# Altium PCB IoT_Speaker-PCB-v2.1.PcbDoc (part 2 of 3)
Units mm, origin at the board's own origin, x right, y up, seen from the top; angles counter-clockwise.
Board outline 61.96 x 67.79 mm, 2 copper layers (Top Layer, Bottom Layer), stack 1.57 mm thick; 110 components, 59 nets, 362 pads, 125 vias.
Unrouted connection lines stored in the file: 99.
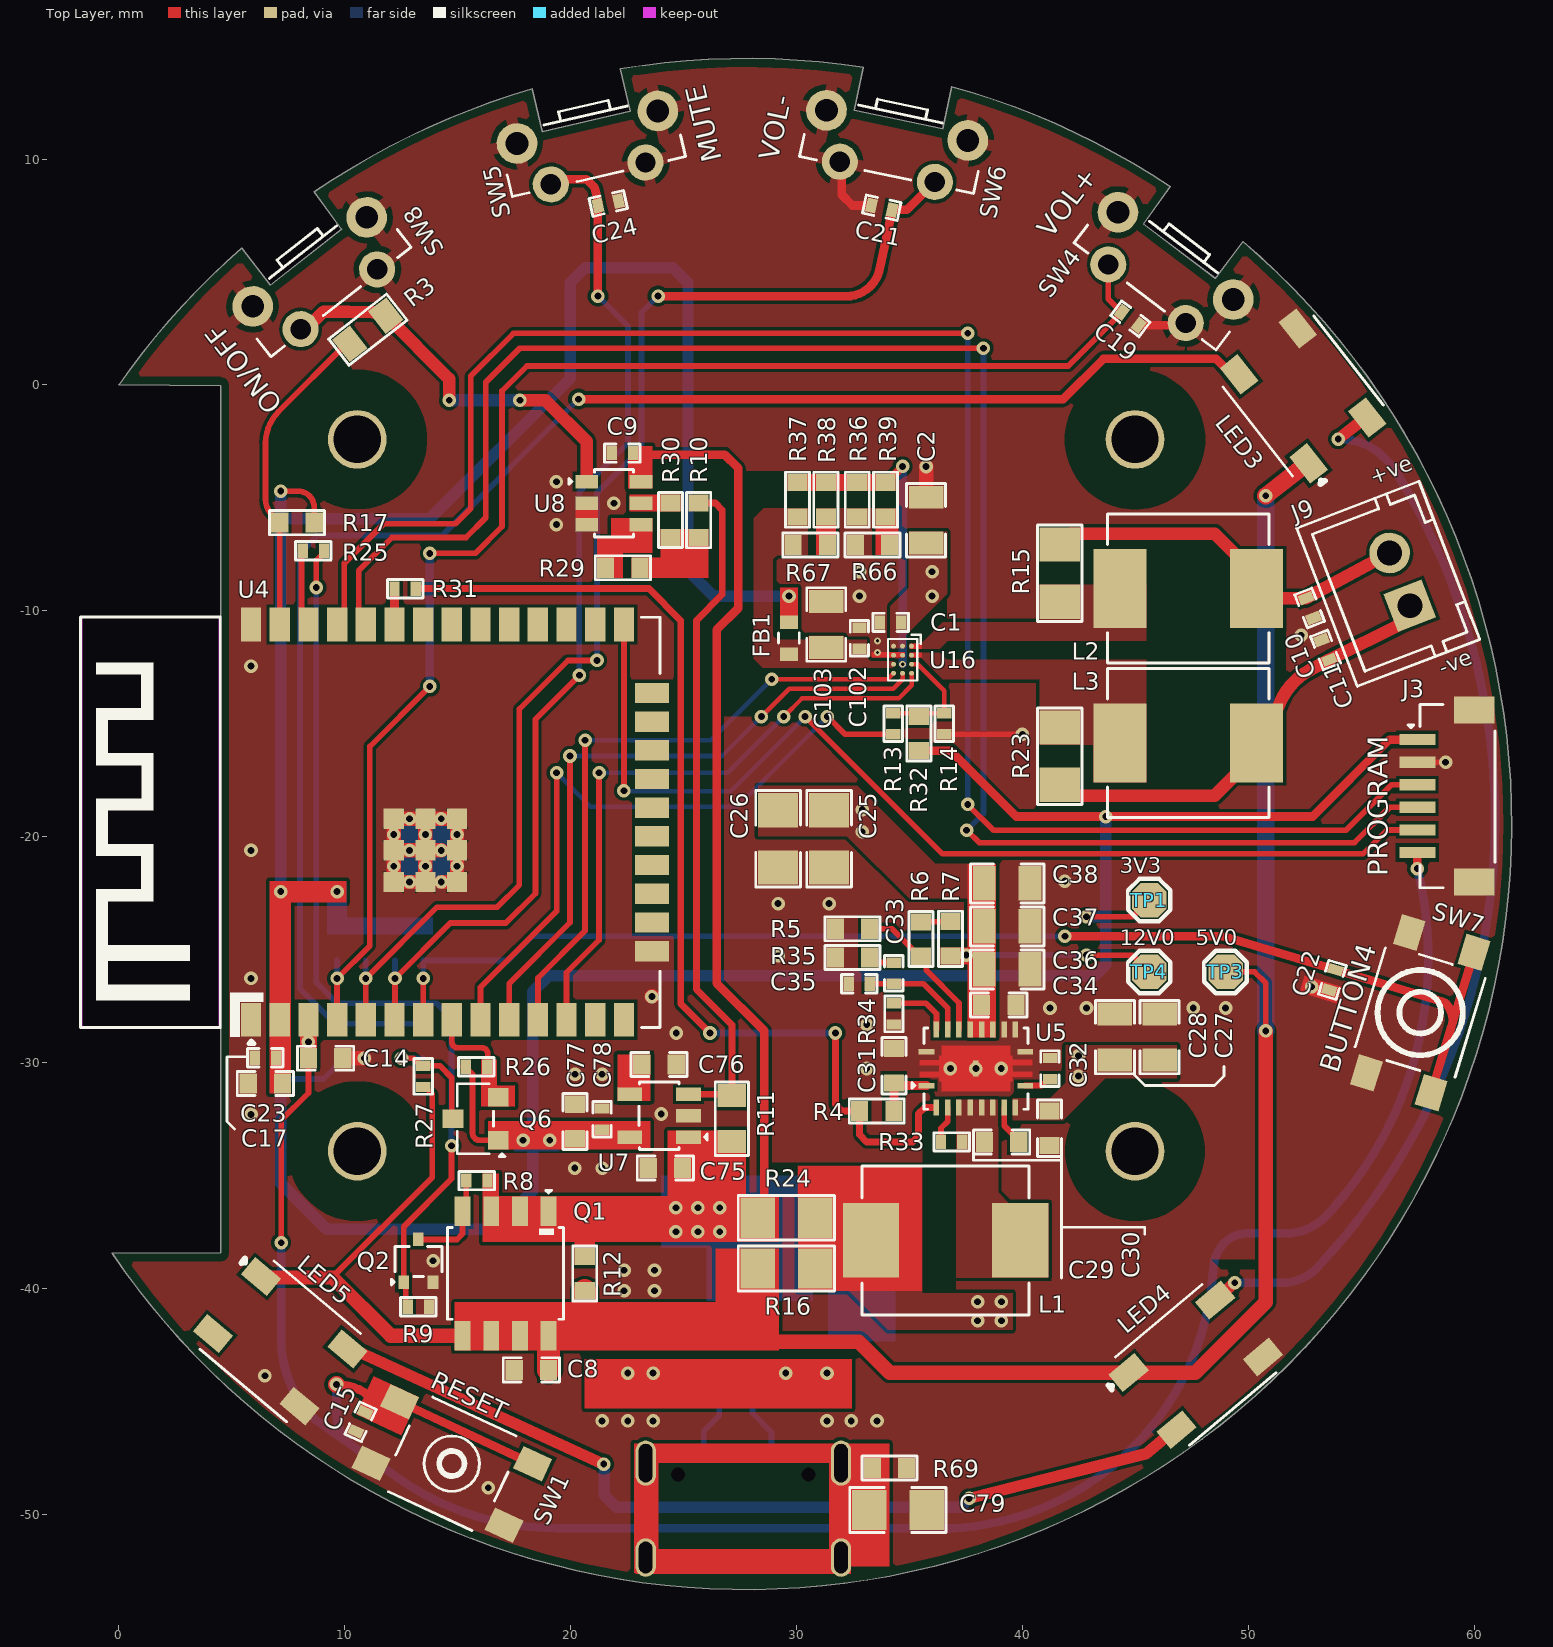
[diagram p0: Top Layer view]

## Part data (continued)
R3 R11: library part RC0805FR-070RL, "RES 0 OHM JUMPER 1/8W 0805", Case Code (Imperial)=0805, Case Code (Metric)=2012, LCSC Part Number=C100045, Manufacturer=Yageo, Max Operating Temperature=155°C, Max Power Dissipation=125mW, Min Operating Temperature=-55°C, Resistance=0mR, Resistor Type="Thick Film", Tolerance=1%, Case/Package=0805, Category="Chip SMD Resistors", ComponentLink1Description=https://datasheet.ciiva.com/15189/getdatasheetpartid-348154-15189885.pdf?src-supplier=Verical, ComponentLink1URL=https://datasheet.ciiva.com/15189/getdatasheetpartid-348154-15189885.pdf?src-supplier=Verical, ComponentLink2Description=https://datasheet.ciiva.com/17042/rc0805-17042698.pdf?src-supplier=Future+Electronics, ComponentLink2URL=https://datasheet.ciiva.com/17042/rc0805-17042698.pdf?src-supplier=Future+Electronics, Construction=Rectangular, Contact Plating=Tin,Matte, Depth=1.25mm, Features="Moisture Resistant", Item Type=Resistor, Lead Free="Lead Free", Length=2mm, Manufacturer Part Number=RC0805FR-070RL, Military Standard=Not, Number of Terminations=2, Packaging="Tape and Reel", Power Rating=125mW, Pricing 1="5000=0.00281, 10000=0.00277, 20000=0.00269 (USD)", Radiation Hardening=No, RoHS=Yes, RoHS Compliant=Yes, Series=RC, Size Code=0805, Stock 1=85000, Supplier 1=Avnet, Supplier Part Number 1=RC0805FR-070RL
R4: library part RC0603FR-07100KL, "RES 100K OHM 1% 1/10W 0603", Case Code (Imperial)=0603, Case Code (Metric)=1608, LCSC Part Number=C14675, Manufacturer=Yageo, Max Operating Temperature=155°C, Max Power Dissipation=100mW, Min Operating Temperature=-55°C, Package Quantity=5000, Resistance Tolerance=1%, Resistor Type="Thick Film", Supplier Part Number=2424020, Temperature Coefficient=100ppm/°C, Voltage Rating=50V, Case/Package=0603, Category="Chip SMD Resistors", ComponentLink1Description=https://datasheet.ciiva.com/11819/0900766b80f96399-11819227.pdf?src-supplier=Rs, ComponentLink1URL=https://datasheet.ciiva.com/11819/0900766b80f96399-11819227.pdf?src-supplier=Rs, ComponentLink2Description=https://datasheet.ciiva.com/2455/pyu-r-int-thick-7-2455183.pdf?src-supplier=Digikey, ComponentLink2URL=https://datasheet.ciiva.com/2455/pyu-r-int-thick-7-2455183.pdf?src-supplier=Digikey, ComponentLink3Description=https://datasheet.ciiva.com/2455/pyu-r-int-thick-7-2455184.pdf?src-supplier=Digikey, ComponentLink3URL=https://datasheet.ciiva.com/2455/pyu-r-int-thick-7-2455184.pdf?src-supplier=Digikey, ComponentLink4Description=https://datasheet.ciiva.com/2455/pyu-r-int-thick-7-2455182.pdf?src-supplier=Digikey, ComponentLink4URL=https://datasheet.ciiva.com/2455/pyu-r-int-thick-7-2455182.pdf?src-supplier=Digikey, Construction=Rectangular, Depth=0.8mm, Features="Moisture Resistant", Height=0.45mm, Item Type=Resistors, Lead Free=5697LeadFree, Length=1.6mm, Manufacturer Part Number=RC0603FR-07100KL, Military Standard=Not, Mounting Technology="Surface Mount", Number of Terminations=2, Packaging="Tape and Reel", Pins=2, Power Rating=100mW, Reach SVHC Compliant=No, RoHS=Yes, RoHS Compliant=Yes, Series=RC, Stock=27300, Supplier=Rs, Technology="THICK FILM", Termination=SMD/SMT, Tolerance=1%, Voltage Rating (DC)=50V, Weight=7.1E-05oz, Width=0.8mm
R5: library part FRC0603F5602TS, "100mW Thick Film Resistors 75V ±100ppm/℃ ±1% 56kΩ 0603 Chip Resistor - Surface Mount ROHS", LCSC Part Number=C2907053, Manufacturer=FOJAN, Package=0603, ComponentLink1Description=LCSC, ComponentLink1URL=https://www.lcsc.com/product-detail/Chip-Resistor-Surface-Mount_FOJAN-FRC0603F5602TS_C2907053.html, Item Type=Resistor, Manufacturer Part Number=FRC0603F5602TS
R6: library part "FRC0603J202 TS", "100mW Thick Film Resistors 75V ±100ppm/℃ ±5% 2kΩ 0603 Chip Resistor - Surface Mount ROHS", LCSC Part Number=C2907137, Manufacturer=FOJAN, Package=0603, ComponentLink1Description=LCSC, ComponentLink1URL=https://www.lcsc.com/product-detail/Chip-Resistor-Surface-Mount_FOJAN-FRC0603J202-TS_C2907137.html, Item Type=Resistor, Manufacturer Part Number="FRC0603J202 TS"
R7: library part AR03BTCX5003N, "100mW Thin Film Resistor 50V ±25ppm/℃ ±0.1% 500kΩ 0603 Chip Resistor - Surface Mount ROHS", LCSC Part Number=C2902631, Manufacturer="Viking Tech", Package=0603, ComponentLink1Description=LCSC, ComponentLink1URL=https://www.lcsc.com/product-detail/Chip-Resistor-Surface-Mount_Viking-Tech-AR03BTCX5003N_C2902631.html, Item Type=Resistor, Manufacturer Part Number=AR03BTCX5003N
R8 R9 R14 R26 R27: library part RC0402FR-0710KL, "RES 10K OHM 1% 1/16W 0402", Case Code (Imperial)=0402, Case Code (Metric)=1005, LCSC Part Number=C60490, Manufacturer=Yageo, Max Operating Temperature=155°C, Max Power Dissipation=63mW, Min Operating Temperature=-55°C, Power Rating=62.5mW, Resistance=10kR, Resistance Tolerance=1%, Resistor Type="Thick Film", Supplier Part Number 1=603-RC0402FR-0710KL, Temperature Coefficient=100ppm/°C, Voltage Rating=50V, Case/Package=0402, Category="Chip SMD Resistors", ComponentLink1Description=https://datasheet.ciiva.com/7660/38568-7660787.pdf?src-supplier=Element14, ComponentLink1URL=https://datasheet.ciiva.com/7660/38568-7660787.pdf?src-supplier=Element14, ComponentLink2Description=https://datasheet.ciiva.com/7849/1686128-7849814.pdf?src-supplier=Element14, ComponentLink2URL=https://datasheet.ciiva.com/7849/1686128-7849814.pdf?src-supplier=Element14, ComponentLink3Description=https://datasheet.ciiva.com/7983/1018594-7983486.pdf?src-supplier=Element14, ComponentLink3URL=https://datasheet.ciiva.com/7983/1018594-7983486.pdf?src-supplier=Element14, ComponentLink4Description=https://datasheet.ciiva.com/22747/1018594-22747512.pdf?src-supplier=Element14, ComponentLink4URL=https://datasheet.ciiva.com/22747/1018594-22747512.pdf?src-supplier=Element14, ComponentLink5Description=https://datasheet.ciiva.com/12667/pyu-rc0402-51-rohs-l-6-r-12667067.pdf?src-supplier=Mouser, ComponentLink5URL=https://datasheet.ciiva.com/12667/pyu-rc0402-51-rohs-l-6-r-12667067.pdf?src-supplier=Mouser, ComponentLink6Description=https://datasheet.ciiva.com/7849/1784430-7849813.pdf?src-supplier=Element14, ComponentLink6URL=https://datasheet.ciiva.com/7849/1784430-7849813.pdf?src-supplier=Element14, ComponentLink7Description=https://datasheet.ciiva.com/7849/1784430-7849815.pdf?src-supplier=Element14, ComponentLink7URL=https://datasheet.ciiva.com/7849/1784430-7849815.pdf?src-supplier=Element14, Construction=Rectangular, Depth=0.5mm, Features="Moisture Resistant", Height=0.32mm, Item Type=Resistor, Lead Free="Lead Free", Lead Pitch=0.2mm, Length=1mm, Manufacturer Part Number=RC0402FR-0710KL, Military Standard=Not, Number of Pins=2, Number of Terminations=2, Packaging="Tape and Reel", Pricing 1="1=0.10000, 10=0.01400, 50=0.01400, 100=0.00500, 1000=0.00300, 10000=0.00200 (USD)", REACH SVHC="No SVHC", RoHS=Yes, RoHS Compliant=Yes, Series=RC, Stock 1=18648329, Supplier 1=Mouser, Termination=SMD/SMT, Tolerance=1%, Voltage Rating (DC)=50V, Width=0.5mm, Working Voltage=50V
R10 R32: library part RC0603JR-074K7L, "RES SMD 4.7K OHM 5% 1/10W 0603", Case Code (Imperial)=0603, Case Code (Metric)=1608, LCSC Part Number=C105428, Manufacturer=Yageo, Max Operating Temperature=155°C, Min Operating Temperature=-55°C, Power Rating=100mW, Resistance=4.7kR, Supplier Part Number 1=311-4.7KGRCT-ND, Temperature Coefficient=100ppm/°C, Tolerance=5%, Voltage Rating=50V, Case/Package=0603, ComponentLink1Description=http://www.farnell.com/datasheets/443971.pdf?src-supplier=Element14, ComponentLink1URL=http://www.farnell.com/datasheets/443971.pdf?src-supplier=Element14, Composition="Thick Film", Depth=0.8mm, Item Type=Resistor, Lead Free="Lead Free", Length=1.6mm, Manufacturer Part Number=RC0603JR-074K7L, Military Standard=Not, Number of Pins=2, Packaging="Tape and Reel", Pricing 1="1=0.1, 10=0.02, 100=0.0081, 1000=0.00362, 2500=0.00314 (USD)", REACH SVHC="No SVHC", Stock 1=19706643, Supplier 1=Digi-Key, Termination=SMD/SMT, Voltage Rating (DC)=50V, Width=0.8mm
R12: library part RC0603JR-070RL, "RES 0 OHM JUMPER 1/10W 0603", Case Code (Imperial)=0603, Case Code (Metric)=1608, LCSC Part Number=C95177, Manufacturer=Yageo, Max Operating Temperature=155°C, Max Power Dissipation=100mW, Min Operating Temperature=-55°C, Package Quantity=5000, Resistance=0mR, Resistance Tolerance=5%, Resistor Type="Thick Film", Supplier Part Number 1=311-0.0GRCT-ND, Temperature Coefficient=200ppm/°C, Tolerance=1%, Voltage Rating=50V, Case/Package=0603, Category="Chip SMD Resistors", Construction=Rectangular, Contact Plating=Tin,Matte, Depth=0.8mm, Features="Moisture Resistant", Height=0.45mm, Item Type=Resistor, Lead Free="Lead Free", Length=1.6mm, Manufacturer Part Number=RC0603JR-070RL, Military Standard=Not, Number of Pins=2, Number of Terminations=2, Packaging="Tape and Reel", Power Rating=100mW, Pricing 1="1=0.10000, 10=0.01700, 25=0.01240, 50=0.00960, 100=0.00700, 250=0.00536, 500=0.00430, 1000=0.00316 (USD)", Radiation Hardening=No, Reach SVHC Compliant="No SVHC", RoHS=Yes, RoHS Compliant=Yes, Series=RC, Size Code=0603, Stock 1=18081776, Supplier 1=Digi-Key, Technology="THICK FILM", Termination=SMD/SMT, Voltage Rating (DC)=50V, Width=0.8mm
R13: library part RC0402JR-071KL, "RES 1K OHM 5% 1/16W 0402", Case Code (Imperial)=0402, Case Code (Metric)=1005, LCSC Part Number=C105637, Manufacturer=Yageo, Max Operating Temperature=155°C, Max Power Dissipation=63mW, Min Operating Temperature=-55°C, Package Quantity=1, Power Rating=62.5mW, Resistance=1kR, Resistance Tolerance=5%, Resistor Type="Thick Film", Supplier Part Number 1=311-1.0KJRCT-ND, Temperature Coefficient=100ppm/°C, Voltage Rating=50V, Case/Package=0402, Category="Chip SMD Resistors", ComponentLink1Description=https://datasheet.ciiva.com/7983/1018594-7983558.pdf?src-supplier=Element14, ComponentLink1URL=https://datasheet.ciiva.com/7983/1018594-7983558.pdf?src-supplier=Element14, ComponentLink2Description=https://datasheet.ciiva.com/2452/pyu-r-int-thick-7-2452756.pdf?src-supplier=Digi-Key, ComponentLink2URL=https://datasheet.ciiva.com/2452/pyu-r-int-thick-7-2452756.pdf?src-supplier=Digi-Key, ComponentLink3Description=https://datasheet.ciiva.com/2452/pyu-r-int-thick-7-2452757.pdf?src-supplier=Digi-Key, ComponentLink3URL=https://datasheet.ciiva.com/2452/pyu-r-int-thick-7-2452757.pdf?src-supplier=Digi-Key, ComponentLink4Description=https://datasheet.ciiva.com/2452/pyu-r-int-thick-7-2452755.pdf?src-supplier=Digi-Key, ComponentLink4URL=https://datasheet.ciiva.com/2452/pyu-r-int-thick-7-2452755.pdf?src-supplier=Digi-Key, ComponentLink5Description=https://datasheet.ciiva.com/7850/1018594-7850170.pdf?src-supplier=Element14, ComponentLink5URL=https://datasheet.ciiva.com/7850/1018594-7850170.pdf?src-supplier=Element14, ComponentLink6Description=https://datasheet.ciiva.com/7850/1018594-7850171.pdf?src-supplier=Element14, ComponentLink6URL=https://datasheet.ciiva.com/7850/1018594-7850171.pdf?src-supplier=Element14, ComponentLink7Description=https://datasheet.ciiva.com/17081/pyu-rc0402-51-rohs-l-6-r-17081438.pdf?src-supplier=Future+Electronics, ComponentLink7URL=https://datasheet.ciiva.com/17081/pyu-rc0402-51-rohs-l-6-r-17081438.pdf?src-supplier=Future+Electronics, Construction=Rectangular, Depth=0.5mm, Features="Moisture Resistant", Height=0.016inch, Item Type=Resistor, Lead Free="Lead Free", Length=0.039inch, Manufacturer Part Number=RC0402JR-071KL, Military Standard=Not, Number of Terminations=2, Packaging="Tape and Reel", Pricing 1="1=0.10000, 10=0.01300, 100=0.00540, 1000=0.00244, 2500=0.00212, 5000=0.00175 (USD)", REACH SVHC="No SVHC", RoHS=Yes, RoHS Compliant=Yes, Series=RC, Size Code=0402, Stock 1=452315, Supplier 1=Digi-Key, Termination=SMD/SMT, Tolerance=5%, Width=0.02inch
R15 R16 R23 R24: library part RC1206JR-070RL, "RES 0 OHM JUMPER 1/4W 1206", Case Code (Imperial)=1206, Case Code (Metric)=3216, Manufacturer=Yageo, Max Operating Temperature=155°C, Max Power Dissipation=250mW, Min Operating Temperature=-55°C, Package Quantity=1, Resistance Tolerance=5%, Resistor Type="Thick Film,Carbon Film", Supplier Part Number=1414689, Temperature Coefficient=200ppm/°C, Voltage Rating=200V, Case/Package=1206, ComponentLink1Description=https://datasheet.ciiva.com/11808/0900766b80c6630a-11808156.pdf?src-supplier=Rs, ComponentLink1URL=https://datasheet.ciiva.com/11808/0900766b80c6630a-11808156.pdf?src-supplier=Rs, ComponentLink2Description=https://datasheet.ciiva.com/29181/402222-da-01-en-smd-widerstand-0-ohm-1206-29181568.pdf?src-supplier=Conrad, ComponentLink2URL=https://datasheet.ciiva.com/29181/402222-da-01-en-smd-widerstand-0-ohm-1206-29181568.pdf?src-supplier=Conrad, ComponentLink3Description=https://datasheet.ciiva.com/7983/444357-7983807.pdf?src-supplier=Element14, ComponentLink3URL=https://datasheet.ciiva.com/7983/444357-7983807.pdf?src-supplier=Element14, ComponentLink4Description=https://datasheet.ciiva.com/22747/1692832-22747541.pdf?src-supplier=Element14, ComponentLink4URL=https://datasheet.ciiva.com/22747/1692832-22747541.pdf?src-supplier=Element14, ComponentLink5Description=https://datasheet.ciiva.com/46445/444357-46445719.pdf?src-supplier=Element14, ComponentLink5URL=https://datasheet.ciiva.com/46445/444357-46445719.pdf?src-supplier=Element14, ComponentLink6Description=https://datasheet.ciiva.com/2458/pyu-rc1206-51-rohs-l-4-2458669.pdf?src-supplier=Digikey, ComponentLink6URL=https://datasheet.ciiva.com/2458/pyu-rc1206-51-rohs-l-4-2458669.pdf?src-supplier=Digikey, ComponentLink7Description=https://datasheet.ciiva.com/2458/pyu-rc1206-51-rohs-l-4-2458670.pdf?src-supplier=Digikey, ComponentLink7URL=https://datasheet.ciiva.com/2458/pyu-rc1206-51-rohs-l-4-2458670.pdf?src-supplier=Digikey, ComponentLink8Description=https://datasheet.ciiva.com/2458/pyu-rc1206-51-rohs-l-4-2458668.pdf?src-supplier=Digikey, ComponentLink8URL=https://datasheet.ciiva.com/2458/pyu-rc1206-51-rohs-l-4-2458668.pdf?src-supplier=Digikey, ComponentLink9Description=https://datasheet.ciiva.com/7857/1692832-7857422.pdf?src-supplier=Element14, ComponentLink9URL=https://datasheet.ciiva.com/7857/1692832-7857422.pdf?src-supplier=Element14, ComponentLink10Description=https://datasheet.ciiva.com/7857/1692832-7857421.pdf?src-supplier=Element14, ComponentLink10URL=https://datasheet.ciiva.com/7857/1692832-7857421.pdf?src-supplier=Element14, ComponentLink11Description=https://datasheet.ciiva.com/17035/pyu-rc1206-51-rohs-l-4-17035512.pdf?src-supplier=Future+Electronics, ComponentLink11URL=https://datasheet.ciiva.com/17035/pyu-rc1206-51-rohs-l-4-17035512.pdf?src-supplier=Future+Electronics, Contact Plating=Tin,Matte, Depth=1.6mm, Features="Moisture Resistant", Height=0.026inch, Item Type=Resistors, Lead Free=5697LeadFree, Length=0.122inch, Manufacturer Part Number=RC1206JR-070RL, Number of Terminations=2, Packaging="Tape and Reel", Power Rating=250mW, Pricing="5000=0.0025, 15000=0.0039, 25000=0.0023, 50000=0.0037, 100000=0.0022, 200000=0.0035, 250000=0.0021, 625000=0.002 (USD)", Reach SVHC Compliant=Unknown, RoHS=Yes, RoHS Compliant=Yes, Series=RC, Stock=1115000, Supplier="Future Electronics", Technology="THICK FILM", Termination=SMD/SMT, Tolerance=5%, Width=0.063inch
R17 R18 R19 R20 R21 R22: library part RC0603FR-0710KL, "RES SMD 10K Ohm 1% 1/10W 0603", Case Code (Imperial)=0603, Case Code (Metric)=1608, LCSC Part Number=C98220, Manufacturer=Yageo, Max Operating Temperature=155°C, Max Power Dissipation=100mW, Min Operating Temperature=-55°C, Resistance=10kR, Resistance Tolerance=1%, Resistor Type="Thick Film", Supplier Part Number 1=311-10.0KHRCT-ND, Temperature Coefficient=100ppm/°C, Voltage Rating=75V, Voltage Rating (DC)=50V, Case/Package=0603, Category="Chip SMD Resistors", ComponentLink1Description=https://datasheet.ciiva.com/7660/38590-7660789.pdf?src-supplier=Element14, ComponentLink1URL=https://datasheet.ciiva.com/7660/38590-7660789.pdf?src-supplier=Element14, ComponentLink2Description=https://datasheet.ciiva.com/7983/443971-7983596.pdf?src-supplier=Element14, ComponentLink2URL=https://datasheet.ciiva.com/7983/443971-7983596.pdf?src-supplier=Element14, ComponentLink3Description=https://datasheet.ciiva.com/22747/443971-22747519.pdf?src-supplier=Element14, ComponentLink3URL=https://datasheet.ciiva.com/22747/443971-22747519.pdf?src-supplier=Element14, ComponentLink4Description=https://datasheet.ciiva.com/46440/1868787-46440891.pdf?src-supplier=Element14, ComponentLink4URL=https://datasheet.ciiva.com/46440/1868787-46440891.pdf?src-supplier=Element14, ComponentLink5Description=https://datasheet.ciiva.com/7746/1738695-7746239.pdf?src-supplier=Element14, ComponentLink5URL=https://datasheet.ciiva.com/7746/1738695-7746239.pdf?src-supplier=Element14, ComponentLink6Description=https://datasheet.ciiva.com/15189/getdatasheetpartid-409289-15189591.pdf?src-supplier=Verical, ComponentLink6URL=https://datasheet.ciiva.com/15189/getdatasheetpartid-409289-15189591.pdf?src-supplier=Verical, Construction=Rectangular, Depth=0.8mm, Features="Moisture Resistant", Height=0.45mm, Item Type=Resistor, Lead Free="Lead Free", Lead Pitch=0.3mm, Length=1.6mm, Manufacturer Part Number=RC0603FR-0710KL, Military Standard=Not, Number of Pins=2, Number of Terminations=2, Packaging="Tape and Reel", Power Rating=100mW, Pricing 1="1=0.10000, 10=0.02400, 100=0.00970, 1000=0.00436, 2500=0.00378 (USD)", REACH SVHC=Unknown, RoHS=Yes, RoHS Compliant=Yes, Series=RC, Size Code=0603, Stock 1=25249139, Supplier 1=Digi-Key, Termination=SMD/SMT, Tolerance=1%, Weight=7.1E-05oz, Width=0.8mm
R25 R31: library part RK73H1ETTP3300F, "RES 330 OHM 1% 1/10W 0402", Case Code (Imperial)=0402, Case Code (Metric)=1005, LCSC Part Number=C159971, Manufacturer="KOA Speer", Max Operating Temperature=155°C, Max Power Dissipation=100mW, Min Operating Temperature=-55°C, Package Quantity=10000, Power Rating=63mW, Ratings=AEC-Q200, Supplier Part Number=6317972, Temperature Coefficient=100ppm/°C, Tolerance=1%, Voltage Rating=50V, Case/Package=0402, Category="Chip SMD Resistors", ComponentLink1Description=https://datasheet.ciiva.com/5555/rk73h-5555909.pdf?src-supplier=Mouser, ComponentLink1URL=https://datasheet.ciiva.com/5555/rk73h-5555909.pdf?src-supplier=Mouser, ComponentLink2Description=https://datasheet.ciiva.com/15203/getdatasheetpartid-424481-15203100.pdf?src-supplier=Verical, ComponentLink2URL=https://datasheet.ciiva.com/15203/getdatasheetpartid-424481-15203100.pdf?src-supplier=Verical, Construction=Rectangular, Features="Moisture Resistant,Automotive AEC-Q200", Height=0.35mm, Lead Free="Lead Free", Length=1mm, Manufacturer Part Number=RK73H1ETTP3300F, Military Standard=Not, Number of Terminations=2, Packaging="Tape and Reel", Pricing="100=0.007, 1000=0.006, 2500=0.006, 5000=0.006, 10000=0.005 (GBP)", RoHS=Yes, RoHS Compliant=Yes, Series=RK73H, Stock=36500, Supplier=Rs, Termination=SMD/SMT, Voltage Rating (DC)=50V, Width=0.5mm
R28: library part RC0603FR-071KL, "RES SMD 1K OHM 1% 1/10W 0603", Case Code (Imperial)=0603, Case Code (Metric)=1608, LCSC Part Number=C22548, Manufacturer=Yageo, Max Operating Temperature=155°C, Min Operating Temperature=-55°C, Power Rating=100mW, Resistance=1kR, Supplier Part Number 1=311-1.00KHRDKR-ND, Temperature Coefficient=100ppm/°C, Tolerance=1%, Voltage Rating=50V, Case/Package=0603, ComponentLink1Description=https://www.verical.com/server-webapp/html/getDatasheet?partID=409289&src-supplier=Verical, ComponentLink1URL=https://www.verical.com/server-webapp/html/getDatasheet?partID=409289&src-supplier=Verical, ComponentLink2Description=http://documents.rs-components.com/techlib://itc_doclist_GB.htm?stockno=5048928&src-supplier=RSComponents, ComponentLink2URL=http://documents.rs-components.com/techlib://itc_doclist_GB.htm?stockno=5048928&src-supplier=RSComponents, ComponentLink3Description=http://www.yageo.com/documents/recent/PYu-RC0603_51_RoHS_L_4.pdf?src-supplier=Avnet+Europe, ComponentLink3URL=http://www.yageo.com/documents/recent/PYu-RC0603_51_RoHS_L_4.pdf?src-supplier=Avnet+Europe, ComponentLink4Description=http://www.farnell.com/datasheets/2167052.pdf?src-supplier=Element14, ComponentLink4URL=http://www.farnell.com/datasheets/2167052.pdf?src-supplier=Element14, ComponentLink5Description=http://www.farnell.com/datasheets/1868787.pdf?src-supplier=Element14, ComponentLink5URL=http://www.farnell.com/datasheets/1868787.pdf?src-supplier=Element14, ComponentLink6Description=http://www.yageo.com/documents/recent/PYu-RC_Group_51_RoHS_L_2.pdf?src-supplier=Avnet, ComponentLink6URL=http://www.yageo.com/documents/recent/PYu-RC_Group_51_RoHS_L_2.pdf?src-supplier=Avnet, ComponentLink7Description=https://www.verical.com/server-webapp/html/getDatasheet?partID=404327&src-supplier=Verical, ComponentLink7URL=https://www.verical.com/server-webapp/html/getDatasheet?partID=404327&src-supplier=Verical, ComponentLink8Description=http://www.farnell.com/datasheets/443971.pdf?src-supplier=Element14, ComponentLink8URL=http://www.farnell.com/datasheets/443971.pdf?src-supplier=Element14, Composition="Thick Film", Contact Plating=Tin,Matte, Depth=0.8mm, Height=0.45mm, Item Type=Resistor, Lead Free="Lead Free", Length=1.6mm, Manufacturer Part Number=RC0603FR-071KL, Military Standard=Not, Packaging="Tape and Reel", Pricing 1="1=0.1, 10=0.023, 100=0.0094, 1000=0.0042, 2500=0.0037 (USD)", Radiation Hardening=No, REACH SVHC="No SVHC", Stock 1=21472395, Supplier 1=Digi-Key, Termination=SMD/SMT
R29 R30 R36 R37 R38 R39: library part RC0603FR-070RL, "RES SMD 0R, 1%, 0.1W, 0603", LCSC Part Number=C100044, Manufacturer=Yageo, Package=0603, ComponentLink9Description=LCSC, ComponentLink9URL=https://www.lcsc.com/product-detail/Chip-Resistor-Surface-Mount_YAGEO-RC0603FR-070RL_C100044.html, Item Type=Resistor, Manufacturer Part Number=RC0603FR-070RL
R33: library part AC0402DR-07255KL, "RES 255K OHM 0.5% 1/16W 0402", LCSC Part Number=C226702, Manufacturer=Yageo, Item Type=Resistors, Manufacturer Part Number=AC0402DR-07255KL, Pricing="1=0.1, 10=0.047, 50=0.047, 100=0.036, 1000=0.027, 10000=0.015 (USD)", RoHS=Yes, RoHS Compliant=Yes, Supplier=Mouser
R34: library part RC0402FR-07120KL, "RES 120K OHM 1% 1/16W 0402", Case Code (Imperial)=0402, Case Code (Metric)=1005, LCSC Part Number=C93945, Manufacturer=Yageo, Max Operating Temperature=155°C, Max Power Dissipation=63mW, Min Operating Temperature=-55°C, Package Quantity=1, Resistance=120kR, Resistance Tolerance=1%, Resistor Type="Thick Film", Temperature Coefficient=100ppm/°C, Voltage Rating=50V, Case/Package=0402, Category="Chip SMD Resistors", ComponentLink1Description=https://datasheet.ciiva.com/11808/0900766b80c66297-11808308.pdf?src-supplier=RSComponents, ComponentLink1URL=https://datasheet.ciiva.com/11808/0900766b80c66297-11808308.pdf?src-supplier=RSComponents, ComponentLink2Description=https://datasheet.ciiva.com/2453/pyu-r-int-thick-7-2453518.pdf?src-supplier=Digi-Key, ComponentLink2URL=https://datasheet.ciiva.com/2453/pyu-r-int-thick-7-2453518.pdf?src-supplier=Digi-Key, ComponentLink3Description=https://datasheet.ciiva.com/2453/pyu-r-int-thick-7-2453519.pdf?src-supplier=Digi-Key, ComponentLink3URL=https://datasheet.ciiva.com/2453/pyu-r-int-thick-7-2453519.pdf?src-supplier=Digi-Key, ComponentLink4Description=https://datasheet.ciiva.com/2453/pyu-r-int-thick-7-2453517.pdf?src-supplier=Digi-Key, ComponentLink4URL=https://datasheet.ciiva.com/2453/pyu-r-int-thick-7-2453517.pdf?src-supplier=Digi-Key, ComponentLink5Description=https://datasheet.ciiva.com/12577/pyu-rc0402-51-rohs-l-6-r-12577334.pdf?src-supplier=Mouser, ComponentLink5URL=https://datasheet.ciiva.com/12577/pyu-rc0402-51-rohs-l-6-r-12577334.pdf?src-supplier=Mouser, ComponentLink6Description=https://datasheet.ciiva.com/7849/1018594-7849829.pdf?src-supplier=Element14, ComponentLink6URL=https://datasheet.ciiva.com/7849/1018594-7849829.pdf?src-supplier=Element14, ComponentLink7Description=https://datasheet.ciiva.com/16741/pyu-rc0402-51-rohs-l-6-r-16741433.pdf?src-supplier=Future+Electronics, ComponentLink7URL=https://datasheet.ciiva.com/16741/pyu-rc0402-51-rohs-l-6-r-16741433.pdf?src-supplier=Future+Electronics, Construction=Rectangular, Depth=0.5mm, Features="Moisture Resistant", Height=0.016inch, Item Type=Resistor, Lead Free="Lead Free", Length=1mm, Manufacturer Part Number=RC0402FR-07120KL, Military Standard=Not, Number of Terminations=2, Packaging="Tape and Reel", Power Rating=63mW, Pricing 1="10000=0.00085 (USD)", RoHS=Yes, RoHS Compliant=Yes, Series=RC, Stock 1=12000, Supplier 1=Avnet, Supplier Part Number 1=RC0402FR-07120KL, Technology="THICK FILM", Termination=SMD/SMT, Tolerance=1%, Weight=2.3E-05oz, Width=0.02inch, Working Voltage=50V
R35: library part RC0603FR-0717K4L, "RES 17.4K OHM 1% 1/10W 0603", Manufacturer=Yageo, Supplier Part Number=8063364, Voltage Rating (DC)=50V, ComponentLink1Description=https://datasheet.ciiva.com/15189/getdatasheetpartid-325158-15189621.pdf?src-supplier=Verical, ComponentLink1URL=https://datasheet.ciiva.com/15189/getdatasheetpartid-325158-15189621.pdf?src-supplier=Verical, Item Type=Resistor, Lead Free=5697LeadFree, Manufacturer Part Number=RC0603FR-0717K4L, Pricing="5000=0.0014, 50000=0.0014, 150000=0.0013, 375000=0.0013, 1000000=0.0012 (USD)", RoHS=Yes, RoHS Compliant=5897YesNo, Stock=810000, Supplier="Future Electronics"
R66 R67: library part RT0603BRD07100KL, "RES SMD 100K OHM 0.1% 1/10W 0603", Case Code (Imperial)=0603, Case Code (Metric)=1608, LCSC Part Number=C122538, Manufacturer=Yageo, Max Operating Temperature=125°C, Max Power Dissipation=100mW, Min Operating Temperature=-55°C, Package Quantity=5000, Resistance=100kR, Supplier Part Number 1=YAG1235CT-ND, Temperature Coefficient=25ppm/°C, Tolerance=0.1%, Voltage Rating=75V, Case/Package=0603, ComponentLink1Description=http://documents.rs-components.com/techlib://itc_doclist_GB.htm?stockno=6174810&src-supplier=RSComponents, ComponentLink1URL=http://documents.rs-components.com/techlib://itc_doclist_GB.htm?stockno=6174810&src-supplier=RSComponents, Composition="Thin Film", Depth=0.8mm, Features="Moisture Resistant", Height=0.022inch, Item Type=Resistor, Lead Free="Lead Free", Length=1.6mm, Manufacturer Part Number=RT0603BRD07100KL, Military Standard=Not, Mount="Surface Mount", Number of Terminations=2, Packaging="Tape and Reel", Power Rating=100mW, Pricing 1="1=0.39, 10=0.332, 100=0.1298, 1000=0.05435, 2500=0.04982 (USD)", Stock 1=53395, Supplier 1=Digi-Key, Termination=SMD/SMT, Voltage Rating (DC)=75V, Width=0.031inch, Working Voltage=75V
R69: library part RC0603FR-071ML, "RES SMD 1M OHM 1% 1/10W 0603", Case Code (Imperial)=0603, Case Code (Metric)=1608, LCSC Part Number=C105578, Manufacturer=Yageo, Max Operating Temperature=155°C, Min Operating Temperature=-55°C, Package Quantity=5000, Power Rating=100mW, Resistance=1MR, Supplier Part Number 1=311-1.00MHRDKR-ND, Temperature Coefficient=100ppm/°C, Tolerance=1%, Voltage Rating=50V, Case/Package=0603, ComponentLink1Description=http://www.farnell.com/datasheets/2167052.pdf?src-supplier=Mouser, ComponentLink1URL=http://www.farnell.com/datasheets/2167052.pdf?src-supplier=Mouser, ComponentLink2Description=http://www.farnell.com/datasheets/2167052.pdf?src-supplier=Element14, ComponentLink2URL=http://www.farnell.com/datasheets/2167052.pdf?src-supplier=Element14, ComponentLink3Description=http://documents.rs-components.com/techlib://itc_doclist_GB.htm?stockno=5048956&src-supplier=RSComponents, ComponentLink3URL=http://documents.rs-components.com/techlib://itc_doclist_GB.htm?stockno=5048956&src-supplier=RSComponents, Composition="Thick Film", Depth=0.8mm, Height=0.45mm, Item Type=Resistor, Lead Free="Lead Free", Length=1.6mm, Manufacturer Part Number=RC0603FR-071ML, Military Standard=Not, Number of Pins=2, Packaging="Tape and Reel", Pricing 1="1=0.1, 10=0.023, 100=0.0094, 1000=0.00421, 2500=0.00366 (USD)", REACH SVHC="No SVHC", Stock 1=3824601, Supplier 1=Digi-Key, Termination=SMD/SMT, Voltage Rating (DC)=50V, Width=0.8mm
SW1: "No NO 50mA 4.5mm 100000 260gf 12V -30℃~+85℃ 4.5mm 4.3mm Black Round Button Brick nogging SPST SMD Tactile Switches ROHS", LCSC Part Number=C381037, Manufacturer="XKB Connectivity", Package=Custom, ComponentLink1Description=LCSC, ComponentLink1URL=https://www.lcsc.com/product-detail/Tactile-Switches_XKB-Connectivity-TS-1109S-C-B_C381037.html, Item Type=Switch, Manufacturer Part Number=TS-1109S-C-B
SW4 SW5 SW6 SW8: "Plugin-4P,7.7x3.5mm Tactile Switches ROHS", LCSC Part Number=C541963, Manufacturer=Yuandi, Item Type="Tactile Switch", Manufacturer Part Number=TS-1087E-B3D2
SW7: "No NO 50mA 4.5mm 100000 160gf 12V -30℃~+85℃ 4.5mm 8mm Black Round Button Brick nogging SPST SMD Tactile Switches ROHS", LCSC Part Number=C480323, Manufacturer="XKB Connectivity", Package=SMD, ComponentLink1Description=LCSC, ComponentLink1URL=https://www.lcsc.com/product-detail/span-style-background-color-ff0-Tactile-span-Switches_XKB-Connectivity-TS-1109S-B-J_C480323.html, Item Type=Switch, Manufacturer Part Number=TS-1109S-B-J
TP1 TP3 TP4: "Test Point ON", Item Type="TEST POINT"
U4: "RF TXRX MODULE BT PCB TRACE SMD", LCSC Part Number=C5361945, Manufacturer="Espressif Systems", Supplier Part Number=1965-ESP32-WROOM-32E-N8R2DKR-ND, Category=Uncategorized, Item Type=Module, Manufacturer Part Number=ESP32-WROOM-32E-N8R2, Pricing="1=2.88 (USD)", RoHS=No, Supplier=Digikey
U5: "IC REG BOOST ADJ 10A 20VQFN", Case/Package=VQFN, LCSC Part Number=C87357, Manufacturer="Texas Instruments", Max Operating Temperature=85°C, Max Output current=10A, Max Output Voltage=12.6V, Max Supply Voltage=12V, Min Input Voltage=2.7V, Min Operating Temperature=-40°C, Min Output Voltage=4.5V, Quiescent Current=110uA, Switching Frequency=2.2MHz, ComponentLink1Description=http://www.ti.com/lit/ds/symlink/tps61088.pdf?src-supplier=Digikey, ComponentLink1URL=http://www.ti.com/lit/ds/symlink/tps61088.pdf?src-supplier=Digikey, ComponentLink2Description=http://www.ti.com/general/docs/lit/getliterature.tsp?genericPartNumber=TPS61088&&fileType=pdf&src-supplier=Avnet, ComponentLink2URL=http://www.ti.com/general/docs/lit/getliterature.tsp?genericPartNumber=TPS61088&&fileType=pdf&src-supplier=Avnet, Efficiency=91%, Item Type=IC, Lead Free="Lead Free", Manufacturer Part Number=TPS61088RHLR, Mounting Technology="Surface Mount", Number of Outputs=1, Operating Supply Voltage=12V, Output Configuration=Positive, Output Current=10A, Output Type=Adjustable, Output Voltage=12.6V, Packaging="Cut Tape", Pins=20, Pricing="1=3.72, 10=2.51, 50=2.51, 100=2.14, 1000=1.49, 10000=1.32 (USD)", RoHS=Yes, RoHS Compliant=Yes, Series=-, Stock=3877, Supplier=Mouser, Synchronous Rectifier=Yes, Topology=Boost
U7: "SPX3819 Series 3.3 V 500 mA Fixed Output SMT LDO Regulator - SOT-23-5", LCSC Part Number=C9055, Manufacturer=MaxLinear, Supplier Part Number 1=23R9703, Category="Voltage Regulators - Linear", ComponentLink1Description=LCSC, ComponentLink1URL=https://www.lcsc.com/product-detail/Linear-Voltage-Regulators-LDO_MaxLinear-SPX3819M5-L-3-3-TR_C9055.html, Item Type=IC, Manufacturer Part Number=SPX3819M5-L-3-3/TR, RoHS=Yes, RoHS Compliant=Yes, Supplier 1=Newark
U8: "IC CNTRLR ON/OFF W/DEB TSOT23-6", Case/Package=SOT-23-6, LCSC Part Number=C79401, Manufacturer=Maxim, Max Operating Temperature=125°C, Max Power Dissipation=727W, Max Supply Voltage=5.5V, Min Operating Temperature=-40°C, Min Supply Voltage=2.7V, Number of Voltages Monitored=1, Operating Supply Current=7uA, Undervoltage Threshold=1.8V, Category="Interface ICs", ComponentLink1Description=https://datasheet.ciiva.com/4901/max16054-83881-4901086.pdf?src-supplier=Mouser, ComponentLink1URL=https://datasheet.ciiva.com/4901/max16054-83881-4901086.pdf?src-supplier=Mouser, ComponentLink2Description=https://datasheet.ciiva.com/1784/max16054-1784560.pdf?src-supplier=Digi-Key, ComponentLink2URL=https://datasheet.ciiva.com/1784/max16054-1784560.pdf?src-supplier=Digi-Key, ComponentLink3Description=https://datasheet.ciiva.com/14247/max16054-14247770.pdf?src-supplier=Avnet, ComponentLink3URL=https://datasheet.ciiva.com/14247/max16054-14247770.pdf?src-supplier=Avnet, ComponentLink4Description=https://datasheet.ciiva.com/1784/max16054-1784561.pdf?src-supplier=Digi-Key, ComponentLink4URL=https://datasheet.ciiva.com/1784/max16054-1784561.pdf?src-supplier=Digi-Key, ComponentLink5Description=https://datasheet.ciiva.com/1784/max16054-1784562.pdf?src-supplier=Digi-Key, ComponentLink5URL=https://datasheet.ciiva.com/1784/max16054-1784562.pdf?src-supplier=Digi-Key, Contact Plating=Tin,Matte, Height=0.73mm, Item Type=IC, Length=4mm, Manufacturer Part Number=MAX16054AZT+T, Mounting Technology="Surface Mount", Output Type=PUSH-PULL, Package Quantity=1, Packaging="Tape and Reel", Pins=6, Pricing 1="1=2.99700 (USD)", Radiation Hardening=No, RoHS=Yes, RoHS Compliant=Yes, Series=-, Stock 1=3, Supplier 1="Arrow Electronics", Supplier Part Number 1=MAX16054AZT+T, Watchdog Timer=No, Width=4mm
U16: "Amplifier IC 1-Channel (Mono) Class D 12-WLP (1.21x1.78)", LCSC Part Number=C4991260, Manufacturer="Analog Devices Inc./Maxim Integrated", Package=WLP-12(1.2x1.8), Item Type=Amplifier, Manufacturer Part Number=MAX98365AEWC+

## Free pads (board coordinates)
  round 2.6 hole 2.1 unplated mask+0.05: MH(10.554,-2.408) MH(10.555,-33.921) MH(44.987,-33.921) MH(44.987,-2.408)

## Via types
v1: diameter 0.6, hole 0.3, Top Layer to Bottom Layer, tented both sides, 122 vias
v2: diameter 0.3, hole 0.15, Top Layer to Bottom Layer, tented both sides, 3 vias

## Nets (pads, with @x,y where several pads share a name; then routed paths per layer and width w, separated by ;. In a path a pad name is that pad's centre, name@x,y a point inside that pad or via, vN(x,y) a via of type N, cw(c..) or ccw(c..) an arc to the next point about the centre after c; other vN are vias at no path point)
3.3V: C17.2 C23.2 C77.2 C78.2 FB1.2 J3.1 Q6.1 R17.2 R18.2 R19.2 R20.2 R21.2 R22.2 R26.2 R32.2 TP1.1 U4.2 U7.5 | length 166.5
  Top Layer w0.254: v1(7.169,-4.699) 7.929,-4.699 cw(c7.929,-5.415) 8.645,-5.415 R17.2@8.645,-6.095 ; R26.2@15.356,-30.269 15.458,-30.371 15.512,-30.371 15.66,-30.519 15.66,-33.126 ccw(c15.972,-33.126) 15.835,-33.406 ccw(c15.972,-33.126) 15.972,-33.438 Q6.1@16.795,-33.438 ; v1(42.841,-23.546) 44.882,-23.546 TP1.1@45.618,-22.809
  Top Layer w0.381: R26.2@15.318,-30.18 15.356,-30.218 R26.2@15.356,-30.269 ; R32.2@35.414,-16.192 36.815,-16.192 39.727,-19.104 52.854,-19.104 56.26,-15.698 J3.1@57.487,-15.698
  Bottom Layer w0.254: 7.163,-30.726 9.06,-30.726 9.915,-29.872 R18.2@9.915,-29.808
  Bottom Layer w0.508: 7.169,-5.922 13.766,-5.922 19.981,0.292 19.981,4.533 20.646,5.198 24.52,5.198 25.197,4.521 25.197,-8.232 26.312,-9.347 v1(29.667,-9.347) ; v1(7.169,-4.699) 7.163,-4.705 v1(7.163,-22.428) 7.163,-30.726 7.163,-35.345 9.199,-37.38 16.6,-37.38 18.313,-35.667 18.313,-26.865 19.027,-26.152 43.208,-26.152 43.696,-25.664 43.696,-23.546 ; v1(42.841,-23.546) 43.696,-23.546 ; v1(43.696,-19.11) 43.696,-23.546
  other v1: 17.897,-33.442 19.075,-33.442 9.661,-22.428
3.3V_AMP: C102.2 C103.2 FB1.1 R37.2 R67.2 U16.C3
5V: C5.2 C9.2 C75.2 FB7.2 Q1.1 Q1.2 Q1.3 R8.2 R11.2 R12.1 R24.2 U7.1 U8.6 | length 39.6
  Top Layer w0.381: C9.2@22.762,-3.014 22.762,-3.05 22.8,-3.088 24.308,-3.088 26.827,-3.088 27.419,-3.68 27.419,-9.884 26.462,-10.84 26.462,-26.483 28.575,-28.596 28.575,-36.53 28.6,-36.555 R24.2@28.287,-36.869
  other v1: 24.663,-37.49 25.634,-37.49 26.604,-37.49 24.663,-36.424 25.634,-36.424 26.604,-36.424